# Altium PCB PCB.PcbDoc (part 2 of 8)
Units mm, origin at the board's own origin, x right, y up, seen from the top; angles counter-clockwise.
Board outline 78.8 x 69 mm, 12 copper layers (Top Layer, GND_12, uStrip1, GND_35, Clocks, GND_57, POWER, Slow_Ctrl, GND_810, uStrip2, GND_1012, Bottom Layer), stack 2.926 mm thick; 460 components, 314 nets, 1929 pads, 3409 vias.
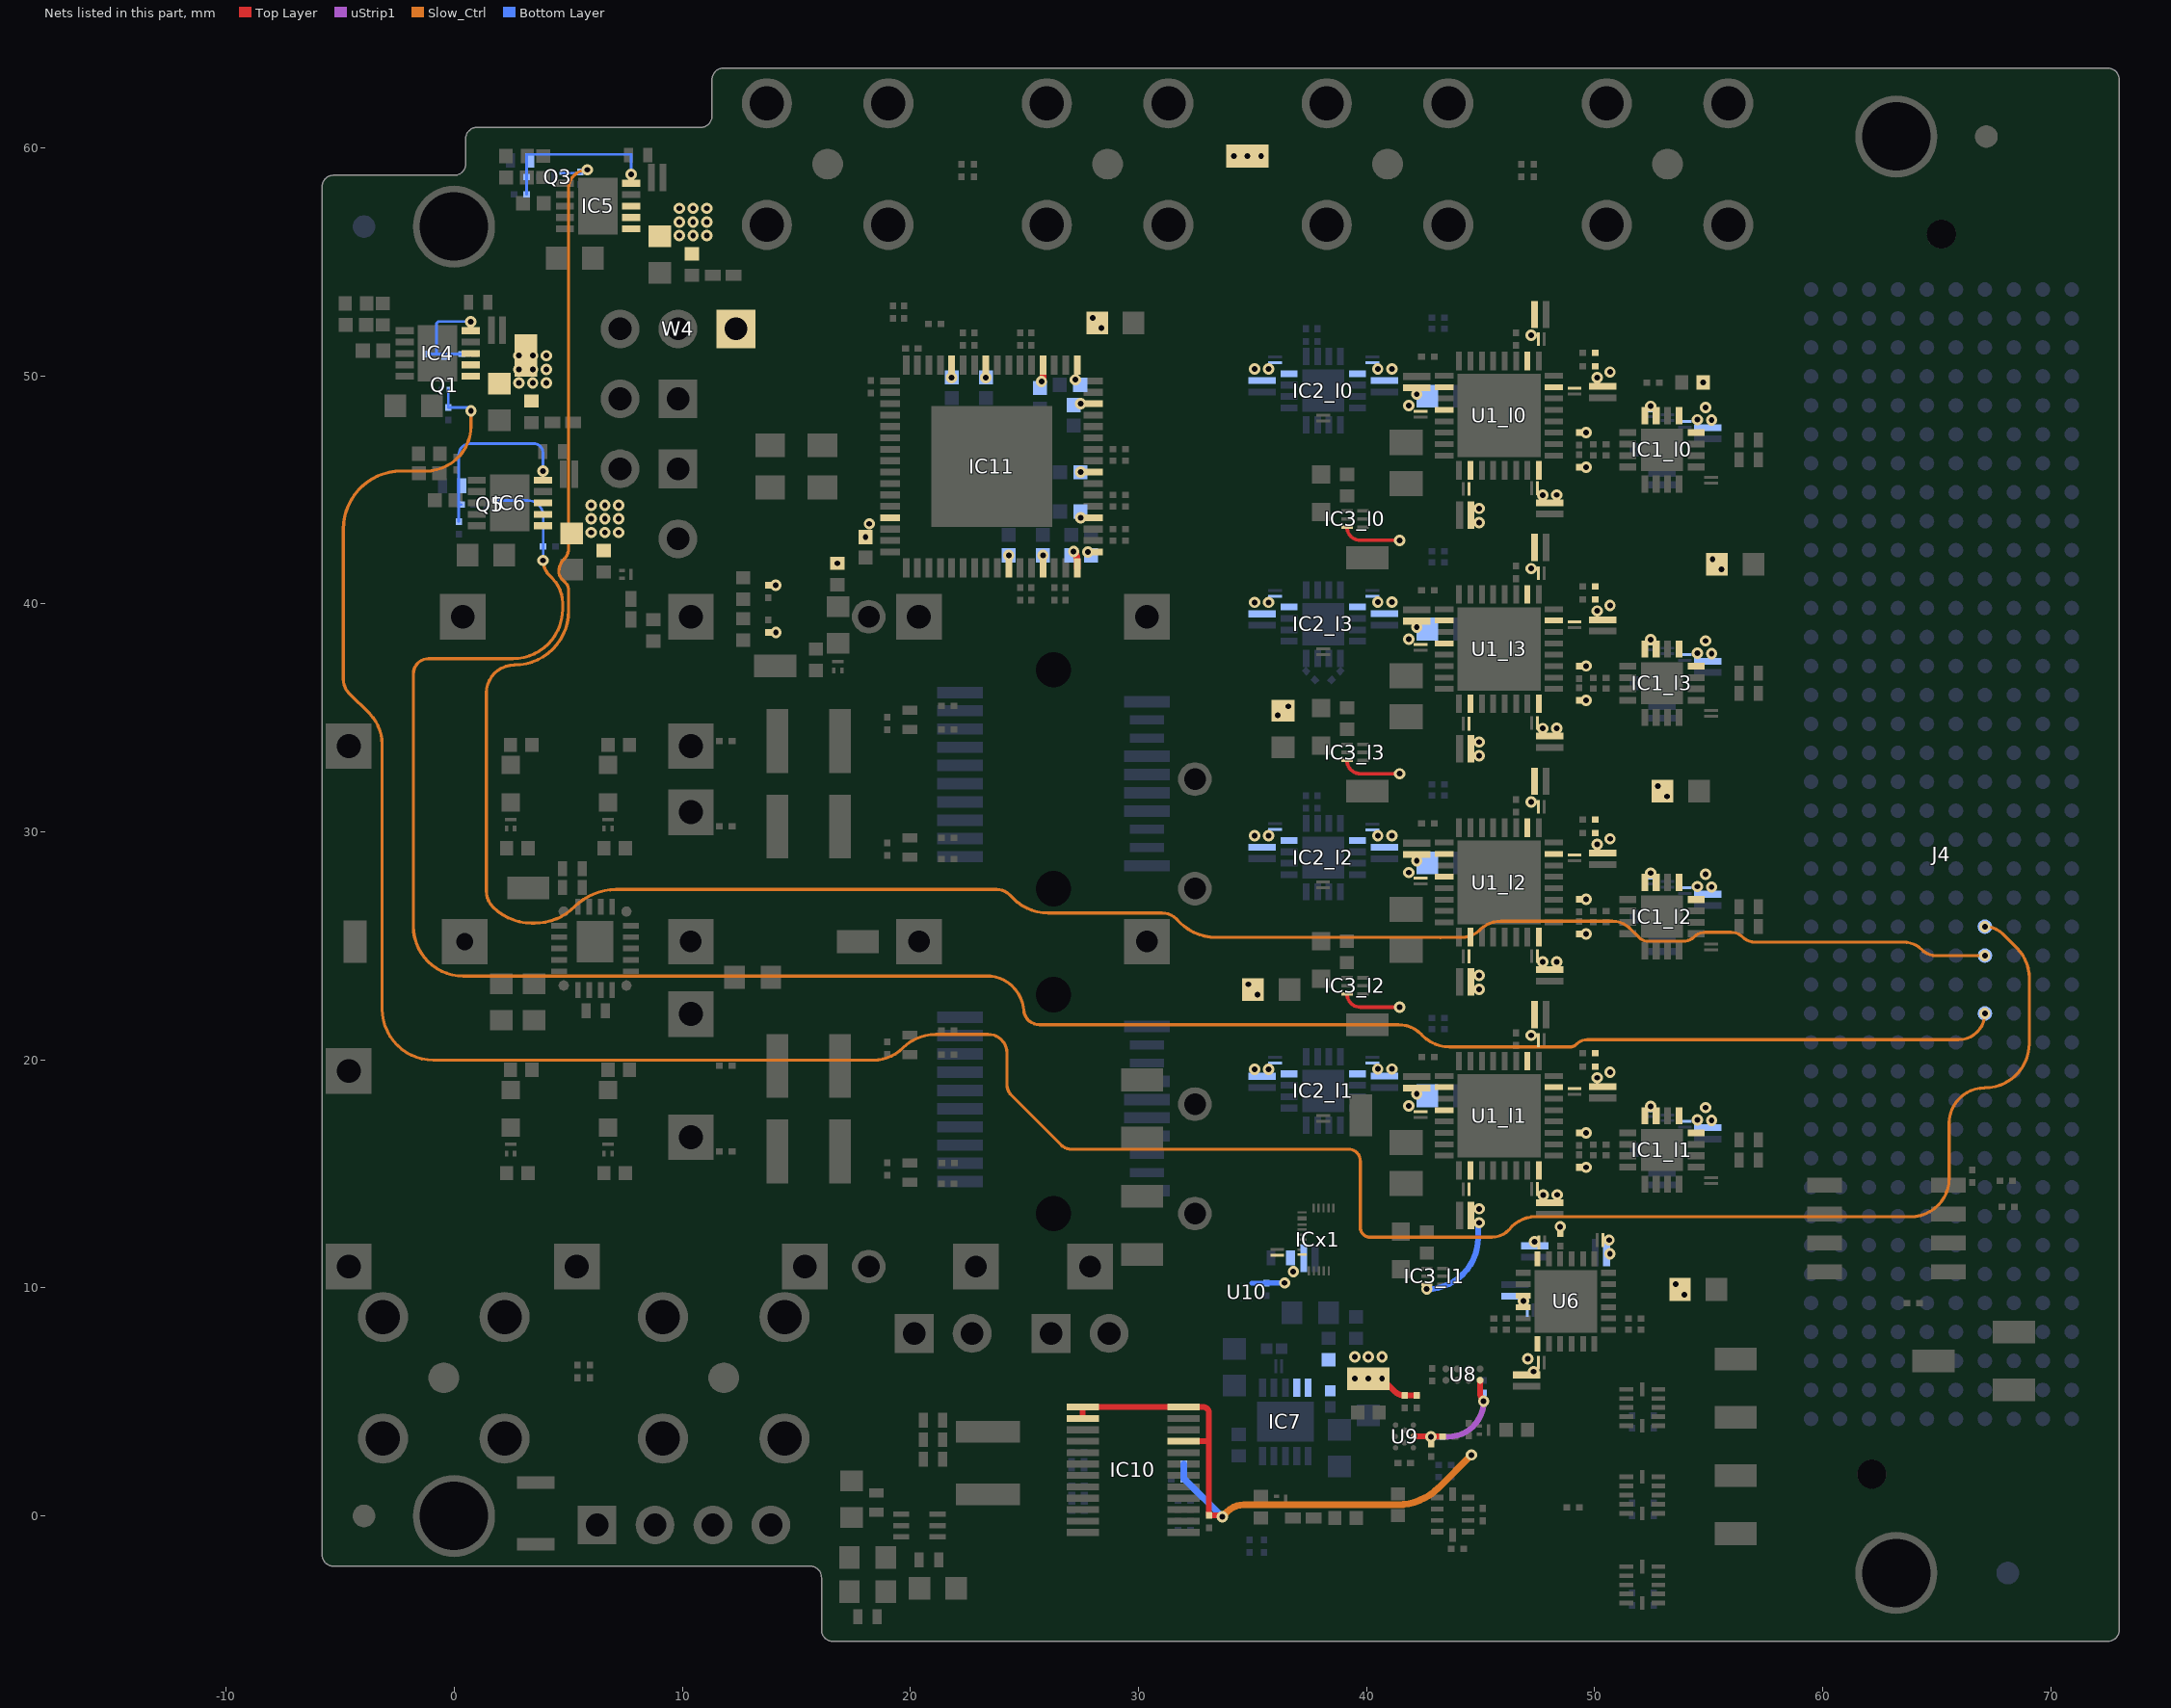
[diagram p12: the nets of this part, all layers, seen from the top]

## Components (designator, comment, footprint, x,y, rotation, side; value= is the part's Value field where it differs from the comment) (continued)
U1_l3 "ADN2817ACPZ-RL7" CP_32_11_ADI 45.803,38.023 r270 top (schematic designator U1)
U2 "TPS563203DRLR" SOT_07SDRLR_TEX 20.395,-0.419 r180 top
U3 "TPSM82866AA0SRDJR" RDJ0023A-MFG 6.172,24.89 r180 top
U4 "TXB0104RUTR" RUT12_TEX 52.089,-3.019 r180 top
U5 "TXB0104RUTR" RUT12_TEX 52.089,0.918 r180 top
U6 "SY89297UMG-TR" QFN-24_MCH-L 48.742,9.415 r180 top
U7 "TXB0104RUTR" RUT12_TEX 52.089,4.757 r180 top
U8 "SN74AUC2G241YZPR" YZP8 44.225,6.203 r270 top
U9 "TCA39306DTMR" DTM0008A-MFG 41.661,3.49 r180 top
U10 "SN74AUP1G125DPWR" X2SON_TEX 34.737,9.821 r90 bottom
W1 "Header 2" SAMTEC_HTSW-102-23-L-S 26.167,8.007 r0 top
W2 "Header 2" SAMTEC_HTSW-102-23-L-S 20.164,8.007 r0 top
W3 "Header 4" SAMTEC_HTSW-104-23-L-S 6.26,-0.392 r0 top
W4 "Header 3" SAMTEC_HTSW-103-23-L-S 12.348,52.063 r180 top
W5 "Header 2" SAMTEC_HTSW-102-23-L-S 9.808,48.994 r180 top
W6 "Header 2" SAMTEC_HTSW-102-23-L-S 9.808,45.925 r180 top
W7 "Header 1" SAMTEC_HTSW-101-23-L-S 9.808,42.856 r180 top

## Footprints (in the part's own frame and the unit in brackets; to place one, negate y for a bottom-side part, rotate by r counter-clockwise, add the part's x,y. Pads: shape width x height; smd on the part's side, far side on the other; paste and mask are expansions set on the pad)
74LVC1G3157GS132 [mm]
  rect 0.15x0.5 smd: 1(-0.35,-0.35) 2(0,-0.35) 3(0.35,-0.35) 4(0.35,0.35) 5(0,0.35) 6(-0.35,0.35)
  silkscreen extent -0.4,-0.9 -0.3,-0.8, body extent -0.48,-0.53 0.48,0.53, height 0.36
20072631_NP [mm]
  rect 2x2 hole 1.05: 1(-14.25,-13.15) 2(-5.675,-13.15) 3(8.575,-13.15) 4(14.25,-8.15) 6(-14.25,-3.15) 7(-8.575,1.85) 8(-3.175,1.85) 10(5.675,1.85) 11(8.575,1.85) 12(14.25,1.85) 13(-14.25,6.85) 18(14.25,11.85) 19(14.25,21.85)
  rect 2x2 hole 0.75: 5(0,-8.07)
  rect 2x2 hole 0.95: 9(0,1.85) 14(-14.25,14.35) 15(-14.25,19.35) 16(0,11.85) 17(0,21.85)
  round 1.478 hole 0.95: 20(-14.25,9.65) 21(14.25,9.65) 22(-11.925,23.95) 23(-7.125,23.95) 24(2.325,23.95) 25(7.125,23.95)
  rect 0.5x2 smd: 26(-10.925,21.85) 27(-8.525,21.85) 28(-6.125,21.85) 29(-3.725,21.85) 30(-10.525,13.65) 31(-3.325,13.65) 32(3.325,21.85) 33(5.725,21.85) 34(8.125,21.85) 35(10.525,21.85) 36(3.725,13.65) 37(10.925,13.65)
  silkscreen extent -15.8,-24.65 15.25,24.65, body extent -15.27,-24.47 15.27,24.51, height 10.35
CAPC0510X04N [mm] "Chip Capacitor, 2-Leads, Body 0.52x1.00mm, IPC Medium Density"
  rect 0.3x1.2 smd: 1(-0.25,0) 2(0.25,0)
  body extent -0.29,-0.53 0.29,0.53, height 0.35
CAPC0603X33N [mm] "Chip Capacitor, Body 0.6x0.30mm, IPC Medium Density"
  rect 0.5x0.45 smd paste-0.025 mask-0.025: 1(-0.35,0) 2(0.35,0)
  body extent -0.31,-0.16 0.32,0.17, height 0.33
CAPC1005X55N [mm] "Capacitor, Non-Polarized, Chip; 1.00mm L X 0.50mm W X 0.70mm H, IPC Medium Density"
  rect 0.62x0.62 smd: 1(-0.45,0) 2(0.45,0)
  body extent -0.52,-0.27 0.53,0.28, height 0.55
CAPC1608X87N [mm] "Chip Capacitor, Body 1.6x0.8mm IPC Medium Density"
  rect 0.95x1 smd: 1(-0.8,0) 2(0.8,0)
  body extent -0.87,-0.47 0.88,0.48, height 0.87
CAPC2013X140N [mm] "Capacitor, Non-Polarized, Chip; 2.00mm L X 1.25mm W X 1.40mm H, IPC Medium Density"
  rect 1.1x1.45 smd: 1(-0.9,0) 2(0.9,0)
  silkscreen extent 0,-0.63 0,0.63, body extent -1,-0.62 1.01,0.63, height 1.4
CP_32_11_ADI [mil]
  rect 32x10 smd paste+0 mask+0: 1(-94.5,68.9) 2(-94.5,49.21) 3(-94.5,29.53) 4(-94.5,9.84) 5(-94.5,-9.84) 6(-94.5,-29.53) 7(-94.5,-49.21) 8(-94.5,-68.9) 17(94.5,-68.9) 18(94.5,-49.21) 19(94.5,-29.53) 20(94.5,-9.84) 21(94.5,9.84) 22(94.5,29.53) 23(94.5,49.21) 24(94.5,68.9)
  rect 10x32 smd paste+0 mask+0: 9(-68.9,-94.5) 10(-49.21,-94.5) 11(-29.53,-94.5) 12(-9.84,-94.5) 13(9.84,-94.5) 14(29.53,-94.5) 15(49.21,-94.5) 16(68.9,-94.5) 25(68.9,94.5) 26(49.21,94.5) 27(29.53,94.5) 28(9.84,94.5) 29(-9.84,94.5) 30(-29.53,94.5) 31(-49.21,94.5) 32(-68.9,94.5)
  rect 144x144 smd paste-72 mask+0: 33(0,0)
  silkscreen extent -136,87 -126,97, body extent -99,-99 99,99, height 39
CSD15380F3 [mm]
  rect 0.25x0.15 smd: 1(-0.2,0.175) 2(-0.2,-0.175)
  rect 0.15x0.5 smd: 3(0.2,0)
  silkscreen extent -0.26,0.5 -0.24,0.52, body extent -0.35,-0.3 0.35,0.3, height 0.45
DCPS3-Large [mm]
  rect 0.4x0.1 smd mask+0.06: 1(-0.412,0.1) 2(-0.412,-0.119) 3(-0.412,-0.337) 4(-0.412,-0.556) 5(-0.412,-0.775) 6(2.338,-0.978) 7(2.338,-0.759) 8(2.338,-0.54) 9(2.338,-0.321) 10(2.338,-0.102)
  rect 0.1x0.4 smd mask+0.06: 11(2.149,0.4) 13(1.61,0.4) 14(1.391,0.4) 15(1.172,0.4) 16(0.953,0.4) 17(0.734,0.4) 18(0.515,0.4) 19(0.296,0.4)
  rect 0.2x0.4 smd mask+0.06: 12(1.88,0.4)
DFE322520FD1R0MP2 [mm]
  rect 0.95x2.8 smd: 1(-1.375,0) 2(1.375,0)
  silkscreen extent 0,-1.25 0,1.25, body extent -1.6,-1.25 1.6,1.25, height 2
DTM0008A-MFG [mm]
  round 0.239 smd paste-0.107 mask-0.102: 1(-0.39,0.5) 2(-0.402,0) 3(-0.39,-0.5) 5(0.39,-0.5) 6(0.402,0) 7(0.39,0.5)
  round 0.256 smd paste-0.116 mask-0.114: 4(0,-0.27) 8(0,0.27)
  Top Layer region: 0.058,0.413 0.143,0.328 0.143,0.212 0.058,0.127 -0.058,0.127 -0.143,0.212 -0.143,0.328 -0.058,0.413
  Top Layer region: 0.058,-0.127 0.143,-0.212 0.143,-0.328 0.058,-0.413 -0.058,-0.413 -0.143,-0.328 -0.143,-0.212 -0.058,-0.127
  Top Layer region: -0.301,0.367 -0.55,0.367 -0.632,0.45 -0.632,0.55 -0.55,0.633 -0.23,0.633 -0.147,0.55 -0.147,0.521 -0.172,0.462 -0.242,0.392
  Top Layer region: -0.301,-0.367 -0.55,-0.367 -0.632,-0.45 -0.632,-0.55 -0.55,-0.633 -0.23,-0.633 -0.147,-0.55 -0.148,-0.521 -0.172,-0.462 -0.242,-0.392
  Top Layer region: 0.301,-0.367 0.55,-0.367 0.632,-0.45 0.632,-0.55 0.55,-0.633 0.23,-0.633 0.147,-0.55 0.147,-0.521 0.172,-0.462 0.242,-0.392
  Top Layer region: 0.301,0.367 0.55,0.367 0.632,0.45 0.632,0.55 0.55,0.633 0.23,0.633 0.147,0.55 0.147,0.521 0.172,0.462 0.242,0.392
  Top Layer region: -0.276,-0.132 -0.55,-0.132 -0.633,-0.05 -0.633,0.05 -0.55,0.132 -0.276,0.132 -0.217,0.108 -0.172,0.058 -0.172,-0.058 -0.217,-0.108
  Top Layer region: 0.276,-0.132 0.55,-0.132 0.633,-0.05 0.633,0.05 0.55,0.132 0.276,0.133 0.217,0.108 0.172,0.058 0.172,-0.058 0.217,-0.108
  silkscreen extent -0.89,0.76 -0.64,1.01, body extent -0.4,-0.67 0.4,0.67, height 0.4
EXBU18 [mm]
  rect 0.175x0.3 smd: 1(-0.6,-0.275) 2(-0.2,-0.275) 3(0.2,-0.275) 4(0.6,-0.275) 5(0.6,0.275) 6(0.2,0.275) 7(-0.2,0.275) 8(-0.6,0.275)
  silkscreen extent -0.94,-0.56 -0.84,-0.46, body extent -0.71,-0.3 0.71,0.3, height 0.45
FIDUCIAL_TOP_C100-200 [mm] "Round Fiducial Target, Top Layer, 1.0mm, Top Solder 2.0mm, Keepout =2.0mm"
  round 1 smd paste-0.51 mask+0.5: FTG2(0,0)
  Top Layer keep-out circle w0.1: c0,0 r1
LED_APHHS1005LZGCK-V [mm]
  rect 0.7x0.5 smd mask+0.05: 1(-0.45,0) 2(0.45,0)
  silkscreen extent -0.66,-0.53 -0.61,-0.48, body extent -0.5,-0.25 0.5,0.25, height 0.5
LED_APTD1608LSECKJ3-PF_KNB [mm]
  rect 0.8x0.8 smd paste+0 mask+0: 1(-0.826,0) 2(0.826,0)
  silkscreen extent -1.08,-0.66 -1.03,-0.6, body extent -0.8,-0.41 0.8,0.41, height 0.94
LEDC1608X110N [mm]
  rect 0.9x1 smd: 1(-0.8,0) 2(0.8,0)
  silkscreen extent -1.19,-0.81 -1.09,-0.71, body extent -0.8,-0.4 0.8,0.4, height 0.95
LLL03TR61E333KE01 [mm] "Chip Capacitor, 2-Leads, Body 0.30x0.60mm, IPC High Density"
  rect 0.125x0.6 smd: 1(-0.126,0) 2(0.126,0)
  body extent -0.17,-0.32 0.17,0.32, height 0.2
MURATA_HI_DENSITY_0201 [mm]
  rect 0.3x0.274 smd: 1(-0.275,0) 2(0.275,0)
  body extent -0.32,-0.17 0.32,0.17, height 0.33
MURATA_HI_DENSITY_0402_CAP [mm]
  rect 0.4x0.65 smd: 1(-0.425,0) 2(0.425,0)
  body extent -0.53,-0.28 0.53,0.28, height 0.55
PT100 [mm]
  rect 0.55x1.65 smd: 1(-1.35,0) 2(1.35,0)
  body extent -1.6,-0.8 1.6,0.8, height 0.6
QFN50P300X300X100-17N [mm]
  rect 0.75x0.3 smd: 1(-1.5,0.75) 2(-1.5,0.25) 3(-1.5,-0.25) 4(-1.5,-0.75) 9(1.5,-0.75) 10(1.5,-0.25) 11(1.5,0.25) 12(1.5,0.75)
  rect 0.3x0.75 smd: 5(-0.75,-1.5) 6(-0.25,-1.5) 7(0.25,-1.5) 8(0.75,-1.5) 13(0.75,1.5) 14(0.25,1.5) 15(-0.25,1.5) 16(-0.75,1.5)
  rect 1.85x1.85 smd: 17(0,0)
  silkscreen extent -2,1.38 -1.75,1.62, body extent -1.55,-1.55 1.55,1.55, height 1
QFN50P900X900X90-65N-D [mm]
  rect 0.85x0.3 smd: 1(-4.45,3.75) 2(-4.45,3.25) 3(-4.45,2.75) 4(-4.45,2.25) 5(-4.45,1.75) 6(-4.45,1.25) 7(-4.45,0.75) 8(-4.45,0.25) 9(-4.45,-0.25) 10(-4.45,-0.75) 11(-4.45,-1.25) 12(-4.45,-1.75) 13(-4.45,-2.25) 14(-4.45,-2.75) 15(-4.45,-3.25) 16(-4.45,-3.75) 33(4.45,-3.75) 34(4.45,-3.25) 35(4.45,-2.75) 36(4.45,-2.25) 37(4.45,-1.75) 38(4.45,-1.25) 39(4.45,-0.75) 40(4.45,-0.25) 41(4.45,0.25) 42(4.45,0.75) 43(4.45,1.25) 44(4.45,1.75) 45(4.45,2.25) 46(4.45,2.75) 47(4.45,3.25) 48(4.45,3.75)
  rect 0.3x0.85 smd: 17(-3.75,-4.45) 18(-3.25,-4.45) 19(-2.75,-4.45) 20(-2.25,-4.45) 21(-1.75,-4.45) 22(-1.25,-4.45) 23(-0.75,-4.45) 24(-0.25,-4.45) 25(0.25,-4.45) 26(0.75,-4.45) 27(1.25,-4.45) 28(1.75,-4.45) 29(2.25,-4.45) 30(2.75,-4.45) 31(3.25,-4.45) 32(3.75,-4.45) 49(3.75,4.45) 50(3.25,4.45) 51(2.75,4.45) 52(2.25,4.45) 53(1.75,4.45) 54(1.25,4.45) 55(0.75,4.45) 56(0.25,4.45) 57(-0.25,4.45) 58(-0.75,4.45) 59(-1.25,4.45) 60(-1.75,4.45) 61(-2.25,4.45) 62(-2.75,4.45) 63(-3.25,4.45) 64(-3.75,4.45)
  rect 5.3x5.3 smd: 65(0,0)
  silkscreen extent -5,4.38 -4.75,4.62, body extent -4.55,-4.55 4.55,4.55, height 0.9
QFN-24_MCH-L [mil]
  rect 26x10 smd paste+0 mask+0: 1(-73.5,49.21) 2(-73.5,29.53) 3(-73.5,9.84) 4(-73.5,-9.84) 5(-73.5,-29.53) 6(-73.5,-49.21) 13(73.5,-49.21) 14(73.5,-29.53) 15(73.5,-9.84) 16(73.5,9.84) 17(73.5,29.53) 18(73.5,49.21)
  rect 10x26 smd paste+0 mask+0: 7(-49.21,-73.5) 8(-29.53,-73.5) 9(-9.84,-73.5) 10(9.84,-73.5) 11(29.53,-73.5) 12(49.21,-73.5) 19(49.21,73.5) 20(29.53,73.5) 21(9.84,73.5) 22(-9.84,73.5) 23(-29.53,73.5) 24(-49.21,73.5)
  rect 108x108 smd paste-54 mask+0: 25(0,0)
  silkscreen extent -106,-84 84,84, body extent -79,-79 79,79, height 35
RDJ0023A-MFG [mm]
  round 0.45 smd paste+0 mask+0: 1(-1.375,1.625) 7(-1.375,-1.625) 12(1.375,-1.625) 18(1.375,1.625)
  rect 0.7x0.25 smd paste+0 mask+0: 2(-1.575,1) 3(-1.575,0.5) 4(-1.575,0) 5(-1.575,-0.5) 6(-1.575,-1) 13(1.575,-1) 14(1.575,-0.5) 15(1.575,0) 16(1.575,0.5) 17(1.575,1)
  rect 0.25x0.7 smd paste+0 mask+0: 8(-0.75,-1.825) 9(-0.25,-1.825) 10(0.25,-1.825) 11(0.75,-1.825) 19(0.75,1.825) 20(0.25,1.825) 21(-0.25,1.825) 22(-0.75,1.825)
  rect 1.6x1.8 smd paste-0.887 mask+0: 23(0,-0.3)
  Top Layer region: 1.925,1.425 1.925,1.575 1.875,1.625 1.675,1.625 1.625,1.675 1.625,1.825 1.575,1.875 1.425,1.875 1.375,1.925 1.375,2.125 1.325,2.175 1.175,2.175 1.125,2.125 1.125,1.425 1.175,1.375 1.875,1.375
  Top Layer region: 1.925,-1.425 1.925,-1.575 1.875,-1.625 1.675,-1.625 1.625,-1.675 1.625,-1.825 1.575,-1.875 1.425,-1.875 1.375,-1.925 1.375,-2.125 1.325,-2.175 1.175,-2.175 1.125,-2.125 1.125,-1.425 1.175,-1.375 1.875,-1.375
  Top Layer region: -1.925,-1.425 -1.925,-1.575 -1.875,-1.625 -1.675,-1.625 -1.625,-1.675 -1.625,-1.825 -1.575,-1.875 -1.425,-1.875 -1.375,-1.925 -1.375,-2.125 -1.325,-2.175 -1.175,-2.175 -1.125,-2.125 -1.125,-1.425 -1.175,-1.375 -1.875,-1.375
  Top Layer region: -1.925,1.425 -1.925,1.575 -1.875,1.625 -1.675,1.625 -1.625,1.675 -1.625,1.825 -1.575,1.875 -1.425,1.875 -1.375,1.925 -1.375,2.125 -1.325,2.175 -1.175,2.175 -1.125,2.125 -1.125,1.425 -1.175,1.375 -1.875,1.375
  silkscreen extent -2.28,1.91 -2.03,2.16, body extent -1.75,-2 1.75,2, height 1.45
RESC0603X28N [mm] "Chip Resistor, EIA 0201, Metric 0603, Body 0.6 x 0.3mm, IPC Medium Density"
  rect 0.5x0.45 smd paste-0.025 mask-0.025: 1(-0.33,0) 2(0.33,0)
  body extent -0.32,-0.17 0.33,0.18, height 0.28
RESC1005X40N [mm] "Chip Resistor, EIA 0402, Metric 1005, Body 1.0x0.5mm, IPC Medium Density"
  rect 0.58x0.62 smd: 1(-0.47,0) 2(0.47,0)
  body extent -0.52,-0.27 0.53,0.28, height 0.4
RESC1608X55N [mm] "Chip Resistor, EIA 0603, Metric 1608, Body 1.6x0.8mm, IPC Medium Density"
  rect 0.9x1 smd: 1(-0.8,0) 2(0.8,0)
  body extent -0.87,-0.47 0.88,0.48, height 0.55
RUT12_TEX [mm]
  rect 0.6x0.2 smd paste+0 mask+0.05: 1(-0.7,0.8) 2(-0.7,0.4) 3(-0.7,0) 4(-0.7,-0.4) 5(-0.7,-0.8) 7(0.7,-0.8) 8(0.7,-0.4) 9(0.7,0) 10(0.7,0.4) 11(0.7,0.8)
  rect 0.2x0.6 smd paste+0 mask+0.05: 6(0,-0.8) 12(0,0.8)
  silkscreen extent -1.32,1.14 -1.12,1.34, body extent -0.95,-1.1 0.95,1.1, height 0.6
SAMTEC_HTSW-101-23-L-S [mm] "Single Contact Through Mount Straigh Header (Post Lead 5.84mm, Tail Lead 2.92mm, Insulator 2.54mm)"
  round 1.7 hole 1: 1(0,0)
  silkscreen extent -1.27,-1.27 1.27,1.27, body extent -1.27,-1.27 1.27,1.27, height 8.38
SAMTEC_HTSW-102-23-L-S [mm] "2 Contacts - Pitch 2.54mm - Single Row  Through Mount Straigh Header (Post Lead 5.84mm, Tail Lead 2.92mm, Insulator 2.54mm)"
  rect 1.7x1.7 hole 1: 1(0,0)
  round 1.7 hole 1: 2(2.54,0)
  silkscreen extent -1.27,-1.27 3.81,2.05, body extent -1.27,-1.27 3.81,1.27, height 8.38
SAMTEC_HTSW-103-23-L-S [mm] "3 Contacts - Pitch 2.54mm - Single Row  Through Mount Straigh Header (Post Lead 5.84mm, Tail Lead 2.92mm, Insulator 2.54mm)"
  rect 1.7x1.7 hole 1: 1(0,0)
  round 1.7 hole 1: 2(2.54,0) 3(5.08,0)
  silkscreen extent -1.27,-1.27 6.35,1.93, body extent -1.27,-1.27 6.35,1.27, height 8.38
SAMTEC_HTSW-104-23-L-S [mm] "4 Contacts - Pitch 2.54mm - Single Row Through Mount Straigh Header (Post Lead 5.84mm, Tail Lead 2.92mm, Insulator 2.54mm)"
  rect 1.7x1.7 hole 1: 1(0,0)
  round 1.7 hole 1: 2(2.54,0) 3(5.08,0) 4(7.62,0)
  silkscreen extent -1.27,-1.27 8.89,1.93, body extent -1.27,-1.27 8.89,1.27, height 8.38
SAMTEC_SEAM-40-03.5-S-10-2-A-K-TR [mm]
  round 1.27 hole 1.27 unplated: _1(-27.19,-3.05) ""(27.19,0)
  round 0.64 smd paste+0.125: A1(24.765,5.715) A2(23.495,5.715) A3(22.225,5.715) A4(20.955,5.715) A5(19.685,5.715) A6(18.415,5.715) A7(17.145,5.715) A8(15.875,5.715) A9(14.605,5.715) A10(13.335,5.715) A11(12.065,5.715) A12(10.795,5.715) A13(9.525,5.715) A14(8.255,5.715) A15(6.985,5.715) A16(5.715,5.715) A17(4.445,5.715) A18(3.175,5.715) A19(1.905,5.715) A20(0.635,5.715) A21(-0.635,5.715) A22(-1.905,5.715) A23(-3.175,5.715) A24(-4.445,5.715) A25(-5.715,5.715) A26(-6.985,5.715) A27(-8.255,5.715) A28(-9.525,5.715) A29(-10.795,5.715) A30(-12.065,5.715) A31(-13.335,5.715) A32(-14.605,5.715) A33(-15.875,5.715) A34(-17.145,5.715) A35(-18.415,5.715) A36(-19.685,5.715) A37(-20.955,5.715) A38(-22.225,5.715) A39(-23.495,5.715) A40(-24.765,5.715) B1(24.765,4.445) B2(23.495,4.445) B3(22.225,4.445) B4(20.955,4.445) B5(19.685,4.445) B6(18.415,4.445) B7(17.145,4.445) B8(15.875,4.445) B9(14.605,4.445) B10(13.335,4.445) B11(12.065,4.445) B12(10.795,4.445) B13(9.525,4.445) B14(8.255,4.445) B15(6.985,4.445) B16(5.715,4.445) B17(4.445,4.445) B18(3.175,4.445) B19(1.905,4.445) B20(0.635,4.445) B21(-0.635,4.445) B22(-1.905,4.445) B23(-3.175,4.445) B24(-4.445,4.445) B25(-5.715,4.445) B26(-6.985,4.445) B27(-8.255,4.445) B28(-9.525,4.445) B29(-10.795,4.445) B30(-12.065,4.445) B31(-13.335,4.445) B32(-14.605,4.445) B33(-15.875,4.445) B34(-17.145,4.445) B35(-18.415,4.445) B36(-19.685,4.445) B37(-20.955,4.445) B38(-22.225,4.445) B39(-23.495,4.445) B40(-24.765,4.445) C1(24.765,3.175) C2(23.495,3.175) C3(22.225,3.175) C4(20.955,3.175) C5(19.685,3.175) C6(18.415,3.175) C7(17.145,3.175) C8(15.875,3.175) C9(14.605,3.175) C10(13.335,3.175) C11(12.065,3.175) C12(10.795,3.175) C13(9.525,3.175) C14(8.255,3.175) C15(6.985,3.175) C16(5.715,3.175) C17(4.445,3.175) C18(3.175,3.175) C19(1.905,3.175) C20(0.635,3.175) C21(-0.635,3.175) C22(-1.905,3.175) C23(-3.175,3.175) C24(-4.445,3.175) C25(-5.715,3.175) C26(-6.985,3.175) C27(-8.255,3.175) C28(-9.525,3.175) C29(-10.795,3.175) C30(-12.065,3.175) C31(-13.335,3.175) C32(-14.605,3.175) C33(-15.875,3.175) C34(-17.145,3.175) C35(-18.415,3.175) C36(-19.685,3.175) C37(-20.955,3.175) C38(-22.225,3.175) C39(-23.495,3.175) C40(-24.765,3.175) D1(24.765,1.905) D2(23.495,1.905) D3(22.225,1.905) D4(20.955,1.905) D5(19.685,1.905) D6(18.415,1.905) D7(17.145,1.905) D8(15.875,1.905) D9(14.605,1.905) D10(13.335,1.905) D11(12.065,1.905) D12(10.795,1.905) D13(9.525,1.905) D14(8.255,1.905) D15(6.985,1.905) D16(5.715,1.905) D17(4.445,1.905) D18(3.175,1.905) D19(1.905,1.905) D20(0.635,1.905) D21(-0.635,1.905) D22(-1.905,1.905) D23(-3.175,1.905) D24(-4.445,1.905) D25(-5.715,1.905) D26(-6.985,1.905) D27(-8.255,1.905) D28(-9.525,1.905) D29(-10.795,1.905) D30(-12.065,1.905) D31(-13.335,1.905) D32(-14.605,1.905) D33(-15.875,1.905) D34(-17.145,1.905) D35(-18.415,1.905) D36(-19.685,1.905) D37(-20.955,1.905) D38(-22.225,1.905) D39(-23.495,1.905) D40(-24.765,1.905) E1(24.765,0.635) E2(23.495,0.635) E3(22.225,0.635) E4(20.955,0.635) E5(19.685,0.635) E6(18.415,0.635) E7(17.145,0.635) E8(15.875,0.635) E9(14.605,0.635) E10(13.335,0.635) E11(12.065,0.635) E12(10.795,0.635) E13(9.525,0.635) E14(8.255,0.635) E15(6.985,0.635) E16(5.715,0.635) E17(4.445,0.635) E18(3.175,0.635) E19(1.905,0.635) E20(0.635,0.635) E21(-0.635,0.635) E22(-1.905,0.635) E23(-3.175,0.635) E24(-4.445,0.635) E25(-5.715,0.635) E26(-6.985,0.635) E27(-8.255,0.635) E28(-9.525,0.635) E29(-10.795,0.635) E30(-12.065,0.635) E31(-13.335,0.635) E32(-14.605,0.635) E33(-15.875,0.635) E34(-17.145,0.635) E35(-18.415,0.635) E36(-19.685,0.635) E37(-20.955,0.635) E38(-22.225,0.635) E39(-23.495,0.635) E40(-24.765,0.635) F1(24.765,-0.635) F2(23.495,-0.635) F3(22.225,-0.635) F4(20.955,-0.635) F5(19.685,-0.635) F6(18.415,-0.635) F7(17.145,-0.635) F8(15.875,-0.635) F9(14.605,-0.635) F10(13.335,-0.635) F11(12.065,-0.635) F12(10.795,-0.635) F13(9.525,-0.635) F14(8.255,-0.635) F15(6.985,-0.635) F16(5.715,-0.635) F17(4.445,-0.635) F18(3.175,-0.635) F19(1.905,-0.635) F20(0.635,-0.635) F21(-0.635,-0.635) F22(-1.905,-0.635) F23(-3.175,-0.635) F24(-4.445,-0.635) F25(-5.715,-0.635) F26(-6.985,-0.635) F27(-8.255,-0.635) F28(-9.525,-0.635) F29(-10.795,-0.635) F30(-12.065,-0.635) F31(-13.335,-0.635) F32(-14.605,-0.635) F33(-15.875,-0.635) F34(-17.145,-0.635) F35(-18.415,-0.635) F36(-19.685,-0.635) F37(-20.955,-0.635) F38(-22.225,-0.635) F39(-23.495,-0.635) F40(-24.765,-0.635) G1(24.765,-1.905) G2(23.495,-1.905) G3(22.225,-1.905) G4(20.955,-1.905) G5(19.685,-1.905) G6(18.415,-1.905) G7(17.145,-1.905) G8(15.875,-1.905) G9(14.605,-1.905) G10(13.335,-1.905) G11(12.065,-1.905) G12(10.795,-1.905) G13(9.525,-1.905) G14(8.255,-1.905) G15(6.985,-1.905) G16(5.715,-1.905) G17(4.445,-1.905) G18(3.175,-1.905) G19(1.905,-1.905) G20(0.635,-1.905) G21(-0.635,-1.905) G22(-1.905,-1.905) G23(-3.175,-1.905) G24(-4.445,-1.905) G25(-5.715,-1.905) G26(-6.985,-1.905) G27(-8.255,-1.905) G28(-9.525,-1.905) G29(-10.795,-1.905) G30(-12.065,-1.905) G31(-13.335,-1.905) G32(-14.605,-1.905) G33(-15.875,-1.905) G34(-17.145,-1.905) G35(-18.415,-1.905) G36(-19.685,-1.905) G37(-20.955,-1.905) G38(-22.225,-1.905) G39(-23.495,-1.905) G40(-24.765,-1.905) H1(24.765,-3.175) H2(23.495,-3.175) H3(22.225,-3.175) H4(20.955,-3.175) H5(19.685,-3.175) H6(18.415,-3.175) H7(17.145,-3.175) H8(15.875,-3.175) H9(14.605,-3.175) H10(13.335,-3.175) H11(12.065,-3.175) H12(10.795,-3.175) H13(9.525,-3.175) H14(8.255,-3.175) H15(6.985,-3.175) H16(5.715,-3.175) H17(4.445,-3.175) H18(3.175,-3.175) H19(1.905,-3.175) H20(0.635,-3.175) H21(-0.635,-3.175) H22(-1.905,-3.175) H23(-3.175,-3.175) H24(-4.445,-3.175) H25(-5.715,-3.175) H26(-6.985,-3.175) H27(-8.255,-3.175) H28(-9.525,-3.175) H29(-10.795,-3.175) H30(-12.065,-3.175) H31(-13.335,-3.175) H32(-14.605,-3.175) H33(-15.875,-3.175) H34(-17.145,-3.175) H35(-18.415,-3.175) H36(-19.685,-3.175) H37(-20.955,-3.175) H38(-22.225,-3.175) H39(-23.495,-3.175) H40(-24.765,-3.175) I1(24.765,-4.445) I2(23.495,-4.445) I3(22.225,-4.445) I4(20.955,-4.445) I5(19.685,-4.445) I6(18.415,-4.445) I7(17.145,-4.445) I8(15.875,-4.445) I9(14.605,-4.445) I10(13.335,-4.445) I11(12.065,-4.445) I12(10.795,-4.445) I13(9.525,-4.445) I14(8.255,-4.445) I15(6.985,-4.445) I16(5.715,-4.445) I17(4.445,-4.445) I18(3.175,-4.445) I19(1.905,-4.445) I20(0.635,-4.445) I21(-0.635,-4.445) I22(-1.905,-4.445) I23(-3.175,-4.445) I24(-4.445,-4.445) I25(-5.715,-4.445) I26(-6.985,-4.445) I27(-8.255,-4.445) I28(-9.525,-4.445) I29(-10.795,-4.445) I30(-12.065,-4.445) I31(-13.335,-4.445) I32(-14.605,-4.445) I33(-15.875,-4.445) I34(-17.145,-4.445) I35(-18.415,-4.445) I36(-19.685,-4.445) I37(-20.955,-4.445) I38(-22.225,-4.445) I39(-23.495,-4.445) I40(-24.765,-4.445) J1(24.765,-5.715) J2(23.495,-5.715) J3(22.225,-5.715) J4(20.955,-5.715) J5(19.685,-5.715) J6(18.415,-5.715) J7(17.145,-5.715) J8(15.875,-5.715) J9(14.605,-5.715) J10(13.335,-5.715) J11(12.065,-5.715) J12(10.795,-5.715) J13(9.525,-5.715) J14(8.255,-5.715) J15(6.985,-5.715) J16(5.715,-5.715) J17(4.445,-5.715) J18(3.175,-5.715) J19(1.905,-5.715) J20(0.635,-5.715) J21(-0.635,-5.715) J22(-1.905,-5.715) J23(-3.175,-5.715) J24(-4.445,-5.715) J25(-5.715,-5.715) J26(-6.985,-5.715) J27(-8.255,-5.715) J28(-9.525,-5.715) J29(-10.795,-5.715) J30(-12.065,-5.715) J31(-13.335,-5.715) J32(-14.605,-5.715) J33(-15.875,-5.715) J34(-17.145,-5.715) J35(-18.415,-5.715) J36(-19.685,-5.715) J37(-20.955,-5.715) J38(-22.225,-5.715) J39(-23.495,-5.715) J40(-24.765,-5.715)
  silkscreen extent -27.89,-7.34 29.3,7.34, body extent -27.89,-7.34 28.78,7.34, height 7.04
SAMTEC_SMA-J-P-H-ST-MT1 [mm] "50 Ohms SMA Straight Mixed Technology PCB Jack"
  round 1.35 smd: 1(0,0)
  round 2.2 hole 1.5: 2(2.665,-2.665) 2_1(2.665,2.665) 2_2(-2.665,-2.665) 2_3(-2.665,2.665)
  silkscreen extent -3.17,-3.17 3.17,3.17, body extent -3.17,-3.17 3.18,3.18, height 7.95
SN65LVDS4RSER [mm]
  rect 0.55x0.25 smd: 1(-0.675,0.75) 4(-0.675,-0.75) 6(0.675,-0.75) 9(0.675,0.75)
  rect 0.55x0.2 smd: 2(-0.675,0.25) 3(-0.675,-0.25) 7(0.675,-0.25) 8(0.675,0.25)
  rect 0.3x0.6 smd: 5(0,-0.9) 10(0,0.9)
  silkscreen extent -1.07,1.09 -0.97,1.19, body extent -0.75,-1 0.75,1, height 0.6
SOIC127P600X175-8N [mm]
  rect 1.525x0.65 smd: 1(-2.712,1.905) 2(-2.712,0.635) 3(-2.712,-0.635) 4(-2.712,-1.905) 5(2.712,-1.905) 6(2.712,-0.635) 7(2.712,0.635) 8(2.712,1.905)
  silkscreen extent -3.47,-2.45 1.6,2.58, body extent -3,-2.45 3,2.45, height 1.75
SON50P300X300X80-11N-R175X248 [mm] "SON, 0.50mm Pitch; 10-pin, 3.00mm W  X 3.00mm L X 0.80mm H Body, (w/thermal tab 1.75 X 2.48 mm), IPC Medium Density"
  rect 0.8x0.3 smd: 1(-1.5,1) 2(-1.5,0.5) 3(-1.5,0) 4(-1.5,-0.5) 5(-1.5,-1) 6(1.5,-1) 7(1.5,-0.5) 8(1.5,0) 9(1.5,0.5) 10(1.5,1)
  rect 1.75x2.48 smd: 11(0,0)
  silkscreen extent -2.52,0.88 -2.28,1.13, body extent -1.5,-1.5 1.5,1.5, height 0.8
SON50P300X300X85-11N-D [mm]
  rect 0.8x0.3 smd: 1(-1.45,1) 2(-1.45,0.5) 3(-1.45,0) 4(-1.45,-0.5) 5(-1.45,-1) 6(1.45,-1) 7(1.45,-0.5) 8(1.45,0) 9(1.45,0.5) 10(1.45,1)
  rect 1.74x2.48 smd: 11(0,0)
  silkscreen extent -1.97,1.53 -1.73,1.77, body extent -1.52,-1.5 1.52,1.5, height 0.76
SOP50P490X110-24N [mm]
  rect 1.425x0.3 smd: 1(-2.212,2.75) 2(-2.212,2.25) 3(-2.212,1.75) 4(-2.212,1.25) 5(-2.212,0.75) 6(-2.212,0.25) 7(-2.212,-0.25) 8(-2.212,-0.75) 9(-2.212,-1.25) 10(-2.212,-1.75) 11(-2.212,-2.25) 12(-2.212,-2.75) 13(2.212,-2.75) 14(2.212,-2.25) 15(2.212,-1.75) 16(2.212,-1.25) 17(2.212,-0.75) 18(2.212,-0.25) 19(2.212,0.25) 20(2.212,0.75) 21(2.212,1.25) 22(2.212,1.75) 23(2.212,2.25) 24(2.212,2.75)
  silkscreen extent -3.4,2.95 -3.2,3.15, body extent -2.45,-3.05 2.45,3.05, height 1.1
SOT_07SDRLR_TEX [mil]
  rect 28x9 smd paste+0 mask+0: 1(-31.5,19.69) 2(-31.5,0) 3(-31.5,-19.69) 4(31.5,-19.69) 5(31.5,0) 6(31.5,19.69)
  silkscreen extent -71,-39 31,39, body extent -34,-34 34,34, height 24
TP+195X110 [mm]
  rect 1.85x1 smd: 1(0,0)
  body extent -0.8,-0.45 0.8,0.45, height 1.15
TYCO_1888247-1 [mm] "20 Position, Pitch 0.8mm SFP Receptacle (Small Form-factor Pluggable)"
  rect 2x0.5 smd: 1(-4.1,3.395) 2(-4.1,2.595) 3(-4.1,1.795) 4(-4.1,0.995) 5(-4.1,0.195) 6(-4.1,-0.605) 7(-4.1,-1.405) 8(-4.1,-2.205) 9(-4.1,-3.005) 10(-4.1,-3.805) 11(4.1,-3.405) 14(4.1,-1.005) 15(4.1,-0.205) 16(4.1,0.595) 17(4.1,1.395) 20(4.1,3.795)
  rect 1.5x0.4 smd: 12(4.1,-2.605) 13(4.1,-1.805) 18(4.1,2.195) 19(4.1,2.995)
  round 0.5 hole 1.55 unplated mask+0.525: MTG1(0,4.795) MTG2(0,-4.805)
  Top Layer keep-out lines w0.1: -4.34,5.85 3.94,5.85 3.94,4.385 2.78,4.385 2.78,3.75 -2.78,3.75 -2.78,3.985 -4.34,3.985 -4.34,5.85 ; -4.34,-4.395 -4.34,-5.85 3.94,-5.85 3.94,-3.995 2.78,-3.995 2.78,-3.75 -2.78,-3.75 -2.78,-4.395 -4.34,-4.395
  silkscreen extent -42.4,-7.77 6.3,7.77, body extent -4.5,-5.5 4.5,5.5, height 5.22
X2SON_TEX [mil]
  rect 1x1 smd paste+0 mask+0: 1(-15.5,9.45) 2(-15.5,-9.45) 4(15.5,-9.45) 5(15.5,9.45)
  rect 1x1 smd rot 45 paste+0 mask+0: 3(0,0)
  Top Layer region: -13.86,-4.59 -23.86,-4.59 -23.85,-13.6 -6.85,-13.6 -6.85,-11.6
  Top Layer region: 13.86,-4.59 23.86,-4.59 23.85,-13.6 6.85,-13.6 6.85,-11.6
  Top Layer region: 23.85,13.6 6.85,13.6 6.85,11.6 13.86,4.59 23.86,4.59
  Top Layer region: -6.85,13.6 -23.86,13.59 -23.86,4.59 -13.86,4.59 -6.85,11.6
  Top Layer region: 6.96,0 0,6.96 -6.96,0 0,-6.96
  body extent -16,-16 16,16, height 16
XTAL_KYOCERA_CX3225SB [mm] "SMD Crystal Kyocera, 4 Pin, 3.2mm L X 2.5mm W X 0.6mm H"
  rect 1.05x1.3 smd: 1(-0.925,1.15) 2(-0.925,-1.15) 3(0.925,-1.15) 4(0.925,1.15)
  silkscreen extent -2.12,-1.65 1.3,1.73, body extent -1.3,-1.65 1.3,1.65, height 0.6
YZP8 [mm]
  round 0.305 smd paste+0 mask+0.05: 1(-0.25,0.75) 2(-0.25,0.25) 3(-0.25,-0.25) 4(-0.25,-0.75) 5(0.25,-0.75) 6(0.25,-0.25) 7(0.25,0.25) 8(0.25,0.75)
  body extent -0.47,-0.98 0.47,0.98, height 0.51

## Part data
C1_l0 C1_l1 C1_l2 C1_l3 C4_l0 C4_l1 C4_l2 C4_l3 C7_l0 C7_l1 C7_l2 C7_l3 C9_l0 C9_l1 C9_l2 C9_l3 C14_l0 C14_l1 C14_l2 C14_l3 C16_l0 C16_l1 C16_l2 C16_l3 C19_l0 C19_l1 C19_l2 C19_l3 C21_l0 C21_l1 C21_l2 C21_l3 C26_l0 C26_l1 C26_l2 C26_l3 C38 C51 C60 C132 C134 C136 C138 C143: library part "Capacitor - non polarized", "LLL153C70G474ME17"
C2_l0 C2_l1 C2_l2 C2_l3 C5_l0 C5_l1 C5_l2 C5_l3 C8_l0 C8_l1 C8_l2 C8_l3 C10_l0 C10_l1 C10_l2 C10_l3 C11_l0 C11_l1 C11_l2 C11_l3 C15_l0 C15_l1 C15_l2 C15_l3 C17_l0 C17_l1 C17_l2 C17_l3 C20_l0 C20_l1 C20_l2 C20_l3 C22_l0 C22_l1 C22_l2 C22_l3 C23_l0 C23_l1 C23_l2 C23_l3 C25_l0 C25_l1 C25_l2 C25_l3 C27_l0 C27_l1 C27_l2 C27_l3 C31_l0 C31_l1 C31_l2 C31_l3 C66 C133 C135 C137 C139 C144: library part "Capacitor - non polarized", "LLL03TR61E333KE01"
C3_l0 C3_l1 C3_l2 C3_l3 C6_l0 C6_l1 C6_l2 C6_l3 C34 C35 C43 C46 C47 C56 C57 C62 C65 C67 C129 C130: library part CC0603_10UF_6.3V_20%_X5R, "C1608X5R1E106M080AC", Case=0603, Manufacturer=GENERIC, Manufacturer1 ComponentHeight=0.95mm, Manufacturer1 Example=KEMET, Manufacturer1 Part Number=C0603C106M9PAC, Manufacturer Part Number=CC0603_10uF_6.3V_20%_X5R, Tolerance=±20%, Voltage=6.3V, Author="CERN DEM JLC", Component Type=Standard, CreateDate=03/12/2007, HelpURL=\\cern.ch\dfs\Applications\Altium\Datasheets\CC0603_X5R_KEMET.pdf, LatestRevisionDate=03/12/2007, Mounted=Yes, Part Description="SMD Multilayer Chip Ceramic Capacitor", Part Number=CC0603_10UF_6.3V_20%_X5R, Pin Count=2, Sense=No, SMD=Yes, Socket=No, Status=Preferred, TC=X5R
C12_l0 C12_l1 C12_l2 C12_l3 C24_l0 C24_l1 C24_l2 C24_l3 C37 C44 C45 C50 C53 C54 C55 C59 C70 C73 C76 C79 C131: library part C0402-22uF-high-density, "GRM155R60J226ME11", Vmax=6.3V
C13_l0 C13_l1 C13_l2 C13_l3 C18_l0 C18_l1 C18_l2 C18_l3 C28_l0 C28_l1 C28_l2 C28_l3 C29_l0 C29_l1 C29_l2 C29_l3 C30_l0 C30_l1 C30_l2 C30_l3 C33 C69 C71 C72 C74 C75 C77 C78 C80 C81 C82 C83 C84 C85 C86 C87 C88 C89 C90 C91 C92 C93 C94 C95 C96 C97 C98 C99 C100 C101 C102 C103 C104 C105 C106 C107 C108 C109 C110 C111 C112 C113 C114 C119 C120 C140 C141 C142 C145 C146 C147 C148 C149 C150 C151: library part C0201-100nF-high-density, "GRM033R61C104KE14", Vmax=16V
C32_l0 C32_l1 C32_l2 C32_l3: library part CC0805_470NF_50V_10%_X7R_MURATA_GCM21BR71H474KA55L, "GCM21BR71H474KA55L", Case=0805, Manufacturer=MURATA, Tolerance=±10%, Voltage=50V, Author="CERN DEM JLC", Component Type=Standard, ComponentHeight=1.4mm, CreateDate=5/10/2017, HelpURL=\\cern.ch\dfs\Applications\Altium\Datasheets\CC0805_MURATA_GCM21BR71H474KA55L.pdf, LatestRevisionDate=5/10/2017, Manufacturer Part Number=GCM21BR71H474KA55L, Mounted=Yes, Part Description="SMD Chip Monolithic Ceramic Capacitor for Automotive", Part Number=CC0805_470NF_50V_10%_X7R_MURATA_GCM21BR71H474KA55L, Pin Count=2, Sense=No, SMD=Yes, Socket=No, Status="Not Recommended", TC=X7R
C36 C39 C49 C52 C58 C61 C115 C116 C117 C118 C121 C122 C123 C124 C125 C126 C127 C128: library part CC0402_1UF_16V_10%_X5R, "GRM153B30J105ME15", Case=0402, Manufacturer=GENERIC, Manufacturer1 ComponentHeight=0.55mm, Manufacturer1 Example=TDK, Manufacturer1 Part Number=C1005X5R1C105KT, Tolerance=±10%, Voltage=16V, Author="CERN DEM JLC", Component Type=Standard, CreateDate=10/25/2012, HelpURL=\\cern.ch\dfs\Applications\Altium\Datasheets\CC0402_X5R_TDK_C.pdf, LatestRevisionDate=10/25/2012, Manufacturer Part Number=CC0402_1UF_16V_10%_X5R, Mounted=Yes, Part Description="SMD Multilayer Chip Ceramic Capacitor", Part Number=CC0402_1UF_16V_10%_X5R, Pin Count=2, Sense=No, SMD=Yes, Socket=No, Status=Preferred, TC=X5R
C40 C41 C42: library part C0402-22uF-high-density, "GRM155R71E104KE14", Vmax=6.3V
C48 C63 C68: library part C0402-22uF-high-density, "C0402C220J4GACTU", Vmax=6.3V
C64: library part CC0201_220NF_6.3V_10%_X7S_TDK_C0603X7S0J224K030, "GRM033C80J224KE90D", Case=0201, Manufacturer=TDK, Manufacturer Part Number=C0603X7S0J224K030, Tolerance=±10%, Voltage=6.3V, Author="CERN DEM BC", Component Type=Standard, ComponentHeight=0.33mm, CreateDate=11/25/2020, HelpURL=\\cern.ch\dfs\Applications\Altium\Datasheets\CC0201_X7S_TDK_C.pdf, LatestRevisionDate=11/25/2020, Mounted=Yes, Part Description="SMD Multilayer Chip Ceramic Capacitor", Part Number=CC0201_220NF_6.3V_10%_X7S_TDK_C0603X7S0J224K030, Pin Count=2, Sense=No, SMD=Yes, Socket=No, Status="Not Recommended", TC=X7S
D1 D2 D3 D4: "Led Green 0402 2mA 2.65V 40mcd 102mW", Package="0402 Kingbright Corporation", Check_prices=https://www.snapeda.com/parts/APHHS1005LZGCK-V/Kingbright/view-part/?ref=eda, MF="Kingbright Corporation", MP=APHHS1005LZGCK-V, SnapEDA_Link=https://www.snapeda.com/parts/APHHS1005LZGCK-V/Kingbright/view-part/?ref=snap
D5: "LED", Arrow Part Number=APTD1608LVBC/D, Manufacturer_Name=Kingbright, Mouser Part Number=604-APTD1608LVBCD, Arrow Price/Stock=https://www.arrow.com/en/products/aptd1608lvbcd/kingbright?utm_currency=USD&region=nac, Datasheet Link=https://componentsearchengine.com/Datasheets/1/APTD1608LVBC_D.pdf, Height=1.1mm, Manufacturer_Part_Number=APTD1608LVBC/D, Mouser Price/Stock=https://www.mouser.co.uk/ProductDetail/Kingbright/APTD1608LVBC-D?qs=6oMev5NRZMEfNSg5xIhlKA%3D%3D
FTG1 FTG2 FTG3 FTG4: library part FIDUCIAL_TARGET_C100-200, "Fiducial Target", Author="CERN DEM JLC", Component Type="Standard (No BOM)", ComponentHeight=0mm, CreateDate=09/02/2010, Family=Fiducial, HelpURL=Undefined, LatestRevisionDate=04/04/2012, Mounted=No, PackageDescription="Round Fiducial Target, Top Layer, 1.0mm, Top Solder 2.0mm, Keepout =2.0mm", Part Description="Round Fiducial Target, Top Layer, 1.0mm, Top Solder 2.0mm, Keepout =2.0mm", Part Number=FIDUCIAL_TARGET_C100-200, Pin Count=1, Sense=No, SMD=Yes, Socket=No, Status=None
IC1_l0 IC1_l1 IC1_l2 IC1_l3: "Integrated Circuit", Manufacturer_Name=onsemi, Mouser Part Number=863-NB7V52MMNG, Arrow Part Number=NB7V52MMNG, Arrow Price/Stock=https://www.arrow.com/en/products/nb7v52mmng/on-semiconductor, Datasheet Link=https://www.onsemi.com/pdf/datasheet/nb7v52m-d.pdf, Height=1mm, Manufacturer_Part_Number=NB7V52MMNG, Mouser Price/Stock=https://www.mouser.co.uk/ProductDetail/ON-Semiconductor/NB7V52MMNG?qs=N5dOQkml4H8i91m%252BmwlaUQ%3D%3D
IC2_l0 IC2_l1 IC2_l2 IC2_l3: "Integrated Circuit", Manufacturer_Name=onsemi, Mouser Part Number=863-NB7VQ14MMNHTBG, Arrow Part Number=NB7VQ14MMNHTBG, Arrow Price/Stock=https://www.arrow.com/en/products/nb7vq14mmnhtbg/on-semiconductor?utm_currency=USD&region=nac, Datasheet Link=http://www.onsemi.com/pub/Collateral/NB7VQ14M-D.PDF, Height=1mm, Manufacturer_Part_Number=NB7VQ14MMNHTBG, Mouser Price/Stock=https://www.mouser.co.uk/ProductDetail/onsemi/NB7VQ14MMNHTBG?qs=3PKVEWFFm2%2FWq%2FFZ4xstfg%3D%3D
IC3_l0 IC3_l1 IC3_l2 IC3_l3: "Integrated Circuit", Manufacturer_Name=Nexperia, Mouser Part Number=771-74AUP1G32GS132, Datasheet Link=https://assets.nexperia.com/documents/data-sheet/74AUP1G32.pdf, Height=0.35mm, Manufacturer_Part_Number=74AUP1G32GS,132, Mouser Price/Stock=https://www.mouser.com/Search/Refine.aspx?Keyword=771-74AUP1G32GS132
IC4 IC5 IC6: "Integrated Circuit", Manufacturer_Name="Analog Devices", Mouser Part Number=584-ADP7159ACPZ04R7, Arrow Part Number=ADP7159ACPZ-04-R7, Arrow Price/Stock=https://www.arrow.com/en/products/adp7159acpz-04-r7/analog-devices, Datasheet Link=https://www.analog.com/media/en/technical-documentation/data-sheets/ADP7159.pdf, Height=0.85mm, Manufacturer_Part_Number=ADP7159ACPZ-04-R7, Mouser Price/Stock=https://www.mouser.co.uk/ProductDetail/Analog-Devices/ADP7159ACPZ-04-R7?qs=JeIcUl65ClBXEAZRPtHUVQ%3D%3D
IC7: library part LT3045EDD#PBF, "20V, 500mA, Ultralow Noise, Ultrahigh PSRR Linear Regulator", Case=SON10, Manufacturer="LINEAR TECHNOLOGY", Author="CERN DEM JLC", Bonding=No, Component Type=Standard, ComponentHeight=0.8mm, CreateDate=07/12/2016, Device=LT3045EDD, HelpURL=\\cern.ch\dfs\Applications\Altium\Datasheets\LT3045EDD#PBF.pdf, LatestRevisionDate=03/02/2022, Manufacturer Part Number=LT3045EDD, Mounted=Yes, PackageDescription="SON, 0.50mm Pitch; 10 Pin, 3.00mm W X 3.00mm L X 0.80mm H body (w/Thermal Tab 1.75 X 2.48 mm), IPC Medium Density", Part Description="20V, 500mA, Ultralow Noise, Ultrahigh PSRR Linear Regulator", Part Number=LT3045EDD#PBF, Pin Count=11, PressFit=No, Sense=No, SMD=Yes, Socket=No
IC8: library part PT100, "32207590 - PT100 - 1206 - 0.3degC - -50/130"
IC9: "Integrated Circuit", Manufacturer_Name=STMicroelectronics, Mouser Part Number=511-M24C02-RMN6TP, Arrow Part Number=M24C02-RMN6TP, Arrow Price/Stock=https://www.arrow.com/en/products/m24c02-rmn6tp/stmicroelectronics?region=nac, Datasheet Link=http://www.st.com/st-web-ui/static/active/en/resource/technical/document/datasheet/DM00071904.pdf, Height=1.75mm, Manufacturer_Part_Number=M24C02-RMN6TP, Mouser Price/Stock=https://www.mouser.co.uk/ProductDetail/STMicroelectronics/M24C02-RMN6TP?qs=Jodr3Ka7a6ktinv3aZzndw%3D%3D
IC10: "Integrated Circuit", Manufacturer_Name="Texas Instruments", Mouser Part Number=595-TCA9548ADGSR, Arrow Part Number=TCA9548ADGSR, Arrow Price/Stock=https://www.arrow.com/en/products/tca9548adgsr/texas-instruments?utm_currency=USD&region=nac, Datasheet Link=https://www.ti.com/lit/ds/symlink/tca9548a.pdf?ts=1738746169750&ref_url=https%253A%252F%252Fwww.mouser.de%252F, Height=1.1mm, Manufacturer_Part_Number=TCA9548ADGSR, Mouser Price/Stock=https://www.mouser.co.uk/ProductDetail/Texas-Instruments/TCA9548ADGSR?qs=olJun0bQHM%252B7USbLxm4jDw%3D%3D
IC11: "Integrated Circuit", Manufacturer_Name=Skyworks, Mouser Part Number=634-SI5345B-D-GM, Datasheet Link=https://www.mouser.sg/datasheet/2/472/si5345_44_42_d_datasheet-2507675.pdf, Height=0.9mm, Manufacturer_Part_Number=SI5345B-D-GM, Mouser Price/Stock=https://www.mouser.co.uk/ProductDetail/Skyworks-Solutions-Inc/SI5345B-D-GM?qs=p9T7GgSe1IGHqFUKlxUKrA%3D%3D
IC12: "Integrated Circuit", Manufacturer_Name="Texas Instruments", Mouser Part Number=595-SN65LVDS4RSER, Arrow Part Number=SN65LVDS4RSER, Arrow Price/Stock=https://www.arrow.com/en/products/sn65lvds4rser/texas-instruments, Datasheet Link=http://www.ti.com/lit/gpn/SN65LVDS4, Height=0.6mm, Manufacturer_Part_Number=SN65LVDS4RSER, Mouser Price/Stock=https://www.mouser.co.uk/ProductDetail/Texas-Instruments/SN65LVDS4RSER?qs=kO%2FAGeZgcF8xT3dfx7gx%252Bg%3D%3D
J1: "Connector", Arrow Part Number=2007263-1, Manufacturer_Name="TE Connectivity", Mouser Part Number=571-2007263-1, Arrow Price/Stock=https://www.arrow.com/en/products/2007263-1/te-connectivity?region=europe, Datasheet Link=https://www.te.com/commerce/DocumentDelivery/DDEController?Action=srchrtrv&DocNm=4-1773455-3_Quick_Ref_Guide_SFP%2B_Sol&DocType=Data%20Sheet&DocLang=English&PartCntxt=2007263-1&DocFormat=pdf, Height=9.8mm, Manufacturer_Part_Number=2007263-1, Mouser Price/Stock=https://www.mouser.co.uk/ProductDetail/TE-Connectivity/2007263-1?qs=4zF2lffhceF8GItBX4M8mw%3D%3D
J2 J3: library part TYCO_1888247-1, "20 Position SFP+ Connector (Small Form-factor Pluggable)", Manufacturer="TYCO ELECTRONICS", Manufacturer Part Number=1888247-1, Author="CERN DEM JLC", Component Type=Standard, ComponentHeight=5.4mm, CreateDate=2/27/2012, Family=SFP+, HelpURL=\\cern.ch\dfs\Applications\Altium\Datasheets\TYCO_1888247-1.pdf, LatestRevisionDate=2/27/2012, Mounted=Yes, Part Description="20 Position, Pitch 0.8mm SFP+ Receptacle (Small Form-factor Pluggable)", Part Number=TYCO_1888247-1, Pin Count=20, PressFit=No, Sense=No, SMD=Yes, Socket=No, Status=None
J4 TP1_l0 TP1_l1 TP1_l2 TP1_l3 TP2 TP3 TP4 TP5 TP6 TP7 TP8 TP9 TP10 TP11 TP12 TP13 TP14 TP15 TP16 TP17 TP18 TP19: Package=None, Availability=Unavailable, Price=None
  J4: MF=Samtec, MP=SEAM-40-03.5-S-10-2-A-K-TR
  TP1_l0 TP1_l1 TP1_l2 TP1_l3 TP2 TP3 TP4 TP5 TP6 TP7 TP8 TP9 TP10 TP11 TP12 TP13 TP14 TP15 TP16 TP17 TP18 TP19: MF="{'manufacturer': u'TE Connectivity AMP Connectors'}", MP=RCU-0C
J5 J6 J7 J8 J9 J10: library part SAMTEC_SMA-J-P-H-ST-MT1, Manufacturer=SAMTEC, Manufacturer Part Number=SMA-J-P-H-ST-MT1, Author="CERN DEM HF", Component Type=Standard, ComponentHeight=7.95mm, CreateDate=5/24/2023, Family=SMA, HelpURL=\\cern.ch\dfs\Applications\Altium\Datasheets\SAMTEC_SMA-J-P-H-ST-MT1.pdf, LatestRevisionDate=5/24/2023, Mounted=Yes, Part Description="50 Ohms SMA Straight Mixed Technology PCB Jack", Part Number=SAMTEC_SMA-J-P-H-ST-MT1, Pin Count=5, PressFit=No, Sense=Yes, Sense Comment="assembly limitations", SMD=Yes, Socket=No, Status="Not Recommended"
L1 L2 L3 L4 L5: library part DFE322520FD-4R7M=P2, "Inductor", Arrow Part Number=DFE322520FD-4R7M=P2, Manufacturer_Name="Murata Electronics", Mouser Part Number=81-DFE322520FD4R7MP2, Arrow Price/Stock=https://www.arrow.com/en/products/dfe322520fd-4r7mp2/murata-manufacturing?region=nac, Datasheet Link=https://search.murata.co.jp/Ceramy/image/img/P02/J(E)TE243A-9104.pdf, Height=2mm, Manufacturer_Part_Number=DFE322520FD-4R7M=P2, Mouser Price/Stock=https://www.mouser.co.uk/ProductDetail/Murata-Electronics/DFE322520FD-4R7M%3dP2?qs=17u8i%2FzlE8%252BgAY54mivQ1g%3D%3D
LED1_l0 LED1_l1 LED1_l2 LED1_l3 LED2 LED3 LED4 LED5: "Led Red 0603 2mA 1.8V 50mcd 84mW", Mfr_Name=Kingbright
Q1 Q2 Q3 Q4 Q5 Q6 Q7 Q8 Q9 Q11 Q12: "MOSFET (N-Channel)", Manufacturer_Name="Texas Instruments", Mouser Part Number=595-CSD15380F3, Arrow Part Number=CSD15380F3, Arrow Price/Stock=https://www.arrow.com/en/products/csd15380f3/texas-instruments?region=nac, Datasheet Link=https://www.ti.com/lit/ds/symlink/csd15380f3.pdf?ts=1641221366106&ref_url=https%253A%252F%252Fwww.google.com%252F, Height=0.35mm, Manufacturer_Part_Number=CSD15380F3, Mouser Price/Stock=https://www.mouser.co.uk/ProductDetail/Texas-Instruments/CSD15380F3?qs=zEmsApcVOkXP46xhm0edmA%3D%3D
Q10: library part XTAL_48MHZ_KYOCERA_CX3225SB48000D0FPJC1, "Crystal 4 pins 1=XTAL Control 2=GND3=XTAL 4=GND", Manufacturer=KYOCERA, Manufacturer Part Number=CX3225SB48000D0FPJC1, Author="CERN DEM JLC", Bonding=No, Component Type=Standard, ComponentHeight=0.6mm, CreateDate=6/5/2018, HelpURL=\\cern.ch\dfs\Applications\Altium\Datasheets\XTAL_KYOCERA_CX3225SB.pdf, LatestRevisionDate=6/5/2018, Mounted=Yes, PackageDescription="SMD Crystal Kyocera, 4 Pins, 2.50mm L X 3.20mm W X 0.6mm H", Part Description="Tolerance: ±10ppm, Stability: ±15ppm, 8pF, -40°C to +85°C, Surface Mount Crystal", Part Number=XTAL_48MHZ_KYOCERA_CX3225SB48000D0FPJC1, Pin Count=4, PressFit=No, Sense=No, SMD=Yes, Socket=No
R1_l0 R1_l1 R1_l2 R1_l3 R2_l0 R2_l1 R2_l2 R2_l3 R5_l0 R5_l1 R5_l2 R5_l3 R8 R29 R37 R65 R66 R67 R75: library part R0201-100ohm-high-density, "Resistor"
R3_l0 R3_l1 R3_l2 R3_l3 R4_l0 R4_l1 R4_l2 R4_l3 R23 R27 R43 R44 R45 R48 R51 R52 R53 R56 R57 R58 R59 R60 R61 R62 R63 R64 R68 R69 R76 R81 R82 R83 R84: library part R0201-100ohm-high-density, "Resistor 10k"
R6_l0 R6_l1 R6_l2 R6_l3 R41 R42 R49 R50 R77: library part R0402_1K5_1%_0.0625W_100PPM, "Resistor - 1%", Case=0402, Manufacturer=GENERIC, Manufacturer1 ComponentHeight=0.4mm, Manufacturer1 Example="YAGEO PHYCOMP", Manufacturer1 Part Number=232270671502L, Power=0.0625W, Tolerance=±1%, Author="CERN DEM JLC", Component Type=Standard, CreateDate=12/3/2007, HelpURL=\\cern.ch\dfs\Applications\Altium\Datasheets\R0402_Phycomp_RC0402.pdf, LatestRevisionDate=10/17/2012, Manufacturer Part Number=R0402_1K5_1%_0.0625W_100PPM, Mounted=Yes, Part Description="General Purpose Thick Film Chip Resistor", Part Number=R0402_1K5_1%_0.0625W_100PPM, Pin Count=2, PressFit=No, Sense=No, SMD=Yes, Socket=No, Status="Not Recommended", TC=±100ppm/°C
R7 R10 R28 R32 R36 R40 R78 R79: library part R0201-100ohm-high-density, "Resistor 1M"
R9 R14 R21 R31 R72: library part R0402_750R_1%_0.0625W_100PPM, "Resistor - 1%", Case=0402, Manufacturer=GENERIC, Manufacturer1 ComponentHeight=0.4mm, Manufacturer1 Example="YAGEO PHYCOMP", Manufacturer1 Part Number=232270677501L, Power=0.0625W, Tolerance=±1%, Author="CERN DEM JLC", Component Type=Standard, CreateDate=12/3/2007, HelpURL=\\cern.ch\dfs\Applications\Altium\Datasheets\R0402_Phycomp_RC0402.pdf, LatestRevisionDate=10/17/2012, Manufacturer Part Number=R0402_750R_1%_0.0625W_100PPM, Mounted=Yes, Part Description="General Purpose Thick Film Chip Resistor", Part Number=R0402_750R_1%_0.0625W_100PPM, Pin Count=2, PressFit=No, Sense=No, SMD=Yes, Socket=No, Status="Not Recommended", TC=±100ppm/°C
R11 R17: library part R0402_47K_1%_0.0625W_100PPM, "Resistor - 1%", Case=0402, Manufacturer=GENERIC, Manufacturer1 ComponentHeight=0.4mm, Manufacturer1 Example="YAGEO PHYCOMP", Manufacturer1 Part Number=232270674703L, Power=0.0625W, Tolerance=±1%, Author="CERN DEM JLC", Component Type=Standard, CreateDate=12/3/2007, HelpURL=\\cern.ch\dfs\Applications\Altium\Datasheets\R0402_Phycomp_RC0402.pdf, LatestRevisionDate=10/17/2012, Manufacturer Part Number=R0402_47K_1%_0.0625W_100PPM, Mounted=Yes, Part Description="General Purpose Thick Film Chip Resistor", Part Number=R0402_47K_1%_0.0625W_100PPM, Pin Count=2, PressFit=No, Sense=No, SMD=Yes, Socket=No, Status="Not Recommended", TC=±100ppm/°C
R12 R18: library part R0402_27K_1%_0.0625W_100PPM, "Resistor - 1%", Case=0402, Manufacturer=GENERIC, Manufacturer1 ComponentHeight=0.4mm, Manufacturer1 Example="YAGEO PHYCOMP", Manufacturer1 Part Number=232270672703L, Power=0.0625W, Tolerance=±1%, Author="CERN DEM JLC", Component Type=Standard, CreateDate=12/3/2007, HelpURL=\\cern.ch\dfs\Applications\Altium\Datasheets\R0402_Phycomp_RC0402.pdf, LatestRevisionDate=10/17/2012, Manufacturer Part Number=R0402_27K_1%_0.0625W_100PPM, Mounted=Yes, Part Description="General Purpose Thick Film Chip Resistor", Part Number=R0402_27K_1%_0.0625W_100PPM, Pin Count=2, PressFit=No, Sense=No, SMD=Yes, Socket=No, Status="Not Recommended", TC=±100ppm/°C
R13 R16 R19 R20 R22 R39: library part R0603_30K_1%_0.1W_100PPM, "Resistor - 1%", Case=0603, Manufacturer=GENERIC, Manufacturer1 ComponentHeight=0.55mm, Manufacturer1 Example="NIC COMPONENT", Manufacturer1 Part Number=NRC06F3002TRF, Power=0.1W, Tolerance=±1%, Author="CERN DEM JLC", Component Type=Standard, CreateDate=12/3/2007, HelpURL=\\cern.ch\dfs\Applications\Altium\Datasheets\R0603_NIC_NRC.pdf, LatestRevisionDate=3/13/2008, Manufacturer Part Number=R0603_30K_1%_0.1W_100PPM, Mounted=Yes, Part Description="General Purpose Thick Film Chip Resistor", Part Number=R0603_30K_1%_0.1W_100PPM, Pin Count=2, PressFit=No, Sense=No, SMD=Yes, Socket=No, Status=Preferred, TC=±100ppm/°C
R15: library part R0603_150K_1%_0.1W_100PPM, "Resistor - 1%", Case=0603, Manufacturer=GENERIC, Manufacturer1 ComponentHeight=0.55mm, Manufacturer1 Example="NIC COMPONENT", Manufacturer1 Part Number=NRC06F1503TRF, Power=0.1W, Tolerance=±1%, Author="CERN DEM JLC", Component Type=Standard, CreateDate=12/3/2007, HelpURL=\\cern.ch\dfs\Applications\Altium\Datasheets\R0603_NIC_NRC.pdf, LatestRevisionDate=3/13/2008, Manufacturer Part Number=R0603_150K_1%_0.1W_100PPM, Mounted=Yes, Part Description="General Purpose Thick Film Chip Resistor", Part Number=R0603_150K_1%_0.1W_100PPM, Pin Count=2, PressFit=No, Sense=No, SMD=Yes, Socket=No, Status=Preferred, TC=±100ppm/°C
R24 R33 R38 R46 R47 R54 R55 R73 R74 R80: library part R0402_200K_1%_0.0625W_100PPM, "Resistor - 1%", Case=0402, Manufacturer=GENERIC, Manufacturer1 ComponentHeight=0.4mm, Manufacturer1 Example="YAGEO PHYCOMP", Manufacturer1 Part Number=232270672004L, Power=0.0625W, Tolerance=±1%, Author="CERN DEM JLC", Component Type=Standard, CreateDate=12/3/2007, HelpURL=\\cern.ch\dfs\Applications\Altium\Datasheets\R0402_Phycomp_RC0402.pdf, LatestRevisionDate=10/17/2012, Manufacturer Part Number=R0402_200K_1%_0.0625W_100PPM, Mounted=Yes, Part Description="General Purpose Thick Film Chip Resistor", Part Number=R0402_200K_1%_0.0625W_100PPM, Pin Count=2, PressFit=No, Sense=No, SMD=Yes, Socket=No, Status="Not Recommended", TC=±100ppm/°C
R25: library part R0402_5K1_1%_0.0625W_100PPM, "Resistor - 1%", Case=0402, Manufacturer=GENERIC, Manufacturer1 ComponentHeight=0.4mm, Manufacturer1 Example="YAGEO PHYCOMP", Manufacturer1 Part Number=232270675102L, Power=0.0625W, Tolerance=±1%, Author="CERN DEM JLC", Component Type=Standard, CreateDate=03/12/2007, HelpURL=\\cern.ch\dfs\Applications\Altium\Datasheets\R0402_Phycomp_RC0402.pdf, LatestRevisionDate=17/10/2012, Manufacturer Part Number=R0402_5K1_1%_0.0625W_100PPM, Mounted=Yes, Part Description="General Purpose Thick Film Chip Resistor", Part Number=R0402_5K1_1%_0.0625W_100PPM, Pin Count=2, PressFit=No, Sense=No, SMD=Yes, Socket=No, Status="Not Recommended", TC=±100ppm/°C
R26: library part R0402_20K_1%_0.0625W_100PPM, "Resistor - 1%", Case=0402, Manufacturer=GENERIC, Manufacturer1 ComponentHeight=0.4mm, Manufacturer1 Example="YAGEO PHYCOMP", Manufacturer1 Part Number=232270672003L, Power=0.0625W, Tolerance=±1%, Author="CERN DEM JLC", Component Type=Standard, CreateDate=12/3/2007, HelpURL=\\cern.ch\dfs\Applications\Altium\Datasheets\R0402_Phycomp_RC0402.pdf, LatestRevisionDate=10/17/2012, Manufacturer Part Number=R0402_20K_1%_0.0625W_100PPM, Mounted=Yes, Part Description="General Purpose Thick Film Chip Resistor", Part Number=R0402_20K_1%_0.0625W_100PPM, Pin Count=2, PressFit=No, Sense=No, SMD=Yes, Socket=No, Status="Not Recommended", TC=±100ppm/°C
R30: library part R0402_300R_1%_0.0625W_100PPM, "Resistor - 1%", Case=0402, Manufacturer=GENERIC, Manufacturer1 ComponentHeight=0.4mm, Manufacturer1 Example="YAGEO PHYCOMP", Manufacturer1 Part Number=232270673001L, Power=0.0625W, Tolerance=±1%, Author="CERN DEM JLC", Component Type=Standard, CreateDate=03/12/2007, HelpURL=\\cern.ch\dfs\Applications\Altium\Datasheets\R0402_Phycomp_RC0402.pdf, LatestRevisionDate=17/10/2012, Manufacturer Part Number=R0402_300R_1%_0.0625W_100PPM, Mounted=Yes, Part Description="General Purpose Thick Film Chip Resistor", Part Number=R0402_300R_1%_0.0625W_100PPM, Pin Count=2, PressFit=No, Sense=No, SMD=Yes, Socket=No, Status="Not Recommended", TC=±100ppm/°C
R34: library part R0402_750K_1%_0.0625W_100PPM, "Resistor - 1%", Case=0402, Manufacturer=GENERIC, Manufacturer1 ComponentHeight=0.4mm, Manufacturer1 Example="YAGEO PHYCOMP", Manufacturer1 Part Number=232270677504L, Power=0.0625W, Tolerance=±1%, Author="CERN DEM JLC", Component Type=Standard, CreateDate=03/12/2007, HelpURL=\\cern.ch\dfs\Applications\Altium\Datasheets\R0402_Phycomp_RC0402.pdf, LatestRevisionDate=17/10/2012, Manufacturer Part Number=R0402_750K_1%_0.0625W_100PPM, Mounted=Yes, Part Description="General Purpose Thick Film Chip Resistor", Part Number=R0402_750K_1%_0.0625W_100PPM, Pin Count=2, PressFit=No, Sense=No, SMD=Yes, Socket=No, Status="Not Recommended", TC=±100ppm/°C
R35: library part R0201_0R_JUMPER, "Resistor", Case=0201, Manufacturer=GENERIC, Manufacturer1 ComponentHeight=0.27mm, Manufacturer1 Example=VISHAY, Manufacturer1 Part Number=CRCW02010000Z0ED, Author="CERN DEM JLC", Component Type=Standard, CreateDate=19/11/2014, HelpURL="\\cern.ch\dfs\Applications\Altium\Datasheets\R0201_VISHAY_CRCW e3.pdf", LatestRevisionDate=08/01/2015, Manufacturer Part Number=R0201_0R_JUMPER, Mounted=Yes, Part Description="1A (0.05R Max DC Resistance) Zero Ohm Jumper", Part Number=R0201_0R_JUMPER, Pin Count=2, PressFit=No, Sense=No, SMD=Yes, Socket=No, Status="Not Recommended"
R70 R71: library part R0402_22R_1%_0.0625W_100PPM, "Resistor - 1%", Case=0402, Manufacturer=GENERIC, Manufacturer1 ComponentHeight=0.4mm, Manufacturer1 Example="YAGEO PHYCOMP", Manufacturer1 Part Number=232270672209L, Power=0.0625W, Tolerance=±1%, Author="CERN DEM JLC", Component Type=Standard, CreateDate=12/3/2007, HelpURL=\\cern.ch\dfs\Applications\Altium\Datasheets\R0402_Phycomp_RC0402.pdf, LatestRevisionDate=10/17/2012, Manufacturer Part Number=R0402_22R_1%_0.0625W_100PPM, Mounted=Yes, Part Description="General Purpose Thick Film Chip Resistor", Part Number=R0402_22R_1%_0.0625W_100PPM, Pin Count=2, PressFit=No, Sense=No, SMD=Yes, Socket=No, Status="Not Recommended", TC=±100ppm/°C
RN1 RN2 RN3: "Resistor Network (8-Pin) 10k", Manufacturer_Name=Panasonic, Mouser Part Number=667-EXB-U18103JX, Datasheet Link=https://industrial.panasonic.com/cdbs/www-data/pdf/AOC0000/AOC0000C20.pdf, Height=0.45mm, Manufacturer_Part_Number=EXB-U18103JX, Mouser Price/Stock=https://www.mouser.com/Search/Refine.aspx?Keyword=667-EXB-U18103JX
U1_l0 U1_l1 U1_l2 U1_l3: "CDR", Mfr_Name="Analog Devices Inc", RefDes=RefDes, Type=Type
U2 U4 U5 U7 U8 U9 U10: "No Description Available", Mfr_Name="Texas Instruments", RefDes=RefDes
  U2: Type="Power Management"
  U4 U5 U7 U8 U10: Type=Type
  U9: Type=TYPE
U3: library part XPSM82866AA0SRDJR, "No Description Available", Mfr_Name="Texas Instruments", RefDes=RefDes, Type=TYPE
U6: "Coarse Phase Shifter (5ps/5ns)", Mfr_Name=Microchip, RefDes=RefDes, Type=Type